# Altium PCB H.PcbDoc
Units mil, origin at the board's own origin, x right, y up, seen from the top; angles counter-clockwise.
Board outline 825 x 650 mil, 2 copper layers (Top Layer, Bottom Layer); 21 components, 0 nets, 42 pads, 7 vias.
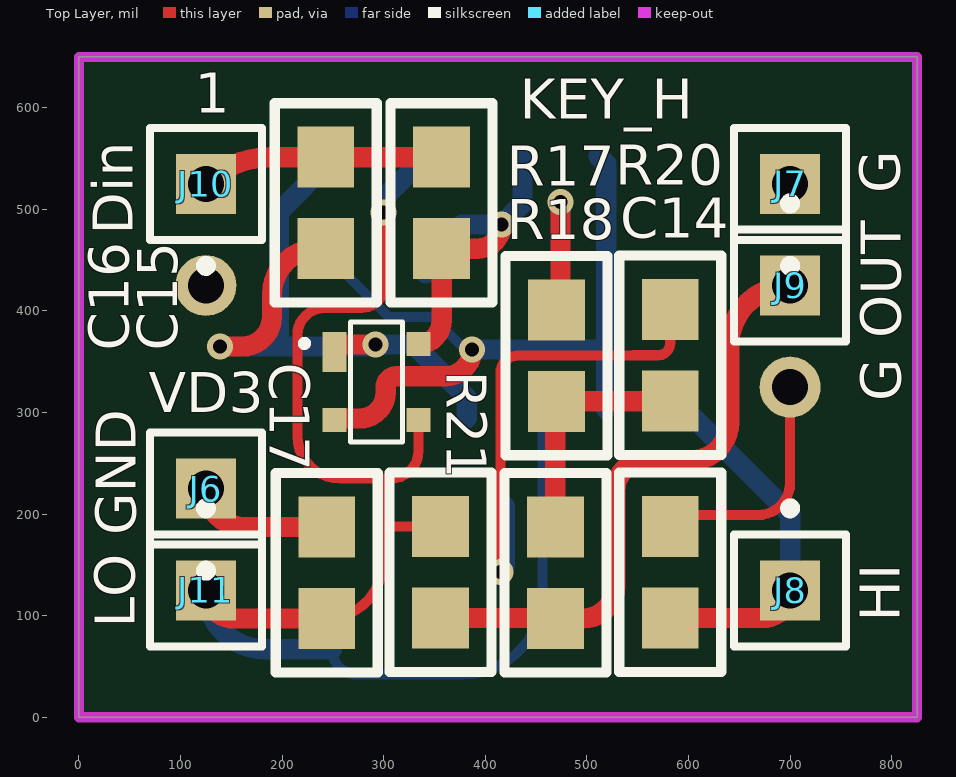
[diagram p0: Top Layer view]
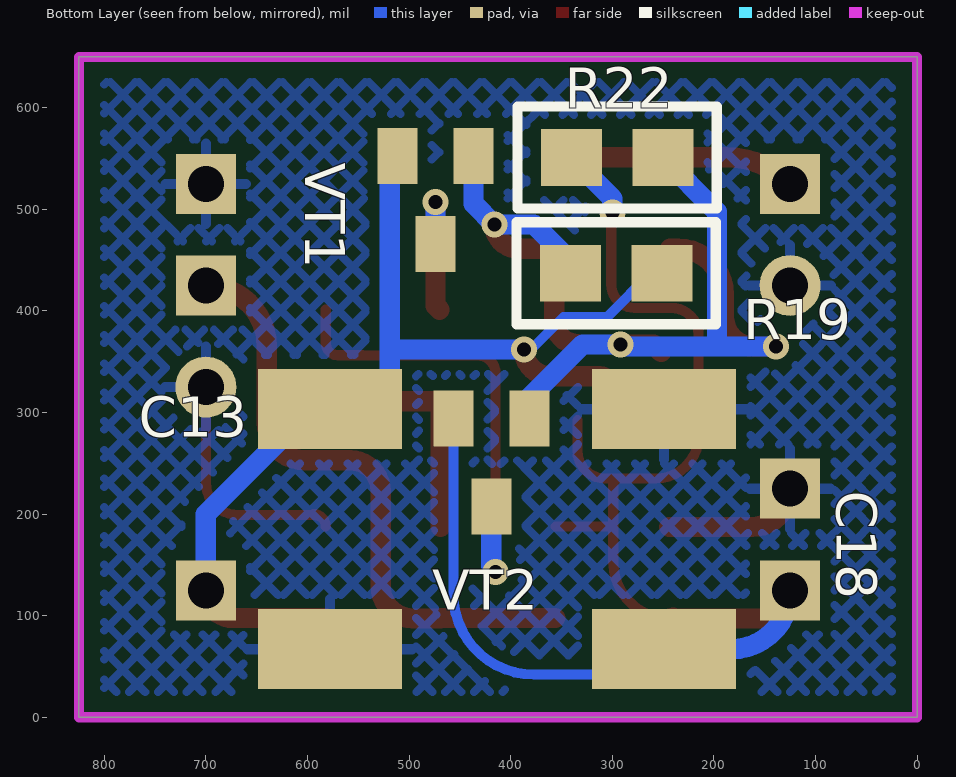
[diagram p1: Bottom Layer view, seen from below]

## Layer stack, top to bottom
Top Solder: solder mask 0.4, Solder Resist, Dk 3.5
Top Layer: signal copper 1.4
Dielectric 1: dielectric 12.6, FR-4, Dk 4.8
Bottom Layer: signal copper 1.4
Bottom Solder: solder mask 0.4, Solder Resist, Dk 3.5

## Board outline
0,0 825,0 825,650 0,650

## Design rules (kind name [scope] priority, off if disabled: settings)
Clearance [All] p1: gap=10
PolygonConnect [All] p1: connectstyle=Relief reliefconductorwidth=10 reliefentries=4 polygonreliefangle="90 Angle" airgapwidth=10
RoutingVias [All] p1: holewidth=28 width=50 viastyle="Through Hole" minholewidth=28 minwidth=50 maxholewidth=28 maxwidth=50
SolderMaskExpansion [All] p1: expansion=4
Width [All] p1: maxlimit=10 minlimit=10 preferedwidth=10
29 further rules are at their usual default settings.

## Components (designator, comment, footprint, x,y, rotation, side; value= is the part's Value field where it differs from the comment)
C13 "22,0" Cap_BIG 653,24 r180 bottom
C14 "0,1" CAP_SMALL 632,44 r90 top
C15 "100" CAP_SMALL 307,605 r270 top
C16 "100" CAP_SMALL 193,605 r270 top
C17 "0,1" CAP_SMALL 194,241 r270 top
C18 "22,0" Cap_BIG 324,24 r180 bottom
J6 "GND" PIN1 125,225 r180 top
J7 "G" PIN1 700,525 r180 top
J8 "HI" PIN1 700,125 r0 top
J9 "OUT" PIN1 700,425 r0 top
J10 "Din" PIN1 125,525 r180 top
J11 "LO" PIN1 125,125 r0 top
R17 "3" RES 519,453.71 r180 top
R18 "3" RES 518,240 r180 top
R19 "2,21" RES 394,486 r270 bottom
R20 "3" RES 631,454 r180 top
R21 "100k" RES 405,240.42 r180 top
R22 "2,21" RES 393,600 r270 bottom
VD3 "HSMS2805" SOT-143B 293,330 r270 top
VT1 "MMBT3640" SOT23-BEC_MMBT3640*(Primary) 474,509 r0 bottom
VT2 "MMBT2369" SOT23-BEC_MMBT3640*(Primary) 419,251 r0 bottom

## Footprints (in the part's own frame and the unit in brackets; to place one, negate y for a bottom-side part, rotate by r counter-clockwise, add the part's x,y. Pads: shape width x height; smd on the part's side, far side on the other; paste and mask are expansions set on the pad)
Cap_BIG [mm] "FROM_MAX"
  rect 3.6x2 smd: 1(1.905,7.092) 2(1.905,1.092)
  body extent 0,-0.01 3.81,8.19, height 2.54
CAP_SMALL [mil] "FROM_MAX"
  rect 60x55.98 smd: 1(53.71,50) 2(143.71,50)
  silkscreen extent 1,0 197,100, body extent 20,18 178,82, height 100
PIN1 [mm] "Connector; Plug"
  rect 1.5x1.5 hole 0.9: 1(0,0)
  silkscreen extent -1.4,-1.4 1.4,2.17
RES [mil] "FROM_MAX"
  rect 55.98x60 smd: 1(49,52.71) 2(49,142.71)
  silkscreen extent -1,0 99,196, body extent 17,19 81,177, height 100
SOT23-BEC_MMBT3640*(Primary) [mm]
  rect 1x1.4 smd: 1(-0.95,-1.1) 2(0.95,-1.1) 3(0,1.1)
SOT-143B [mm]
  rect 1x0.6 smd: 1(-0.75,-1.05)
  rect 0.6x0.6 smd: 2(0.95,-1.05) 3(0.95,1.05) 4(-0.95,1.05)
  silkscreen extent -1.5,-0.65 1.5,0.65

## Part data
C13 C18: library part CAP_BIG
C14 C15 C16 C17: library part CAP_SMALL
J6 J7 J8 J9 J10 J11: library part Socket, "Socket"
R17 R18 R19 R20 R21 R22: library part RES
VD3: library part HSMS-2805

## Free pads (board coordinates)
  round 60 hole 35.43: 1(125,425) 1(700,325)

## Via types
v1: diameter 25.59, hole 13.78, Top Layer to Bottom Layer, 7 vias

## Nets (pads, with @x,y where several pads share a name; then routed paths per layer and width w, separated by ;. In a path a pad name is that pad's centre, name@x,y a point inside that pad or via, vN(x,y) a via of type N, cw(c..) or ccw(c..) an arc to the next point about the centre after c; other vN are vias at no path point)
pads on no net: C13.1 C13.2 C14.1 C14.2 C15.1 C15.2 C16.1 C16.2 C17.1 C17.2 C18.1 C18.2 J6.1 J7.1 J8.1 J9.1 J10.1 J11.1 R17.1 R17.2 R18.1 R18.2 R19.1 R19.2 R20.1 R20.2 R21.1 R21.2 R22.1 R22.2 VD3.1 VD3.2 VD3.3 VD3.4 VT1.1 VT1.2 VT1.3 VT2.1 VT2.2 VT2.3
copper on no net: | length 5771.8
  Top Layer w10: 244,97.29 ccw(c244,152.29) 299,152.29 299,186 ; v1(300,497) cw(c300,496) 301,496 301,426 cw(c278,426) 278,403 242,403 ccw(c242,376) 215,376 215,277 ccw(c257,277) 257,235 299,235 ; 334.34,292.6 334.34,262.34 cw(c307,262.34) 307.53,235.01 ; 356,187.71 300.71,187.71 ccw(c300.71,186) 299,186 ; v1(415,143) 415,337 ; 415,339 cw(c432,339) 432,356 546,356 546,356.29 570,356.29 ccw(c570,368.29) 582,368.29 582,401.29 ; 594.29,200 ccw(c594.29,187.71) 582,187.71 cw(c593.29,187.71) 593.29,199 668,199 ccw(c668,231) 700,231 700,350 ; 299,186 299,235 ; 299,235 307,235 ; 307,235 ccw(c307,262.34) 307.53,235.01 ; 307,235 307.53,235
  Top Layer w20: 125,125 ccw(c152.71,125) 152.71,97.29 244,97.29 ; 125,225 ccw(c162.71,225) 162.71,187.29 244,187.29 ; 125,525 cw(c188.47,461.53) 188.47,551.29 243,551.29 357,551.29 353,555.29 ; v1(139,365) 161,365 ccw(c161,394) 190,394 190,416 cw(c235.29,416) 235.29,461.29 243,461.29 ; 240,98.29 240.58,97.71 ; 251.66,292.6 cw(c253.06,292.6) 253.06,294 276,294 ccw(c276,320) 302,320 302,325 cw(c312.59,325) 312.59,335.59 360.59,335.59 ccw(c360.59,362) v1(387,362) ; 251.66,359.53 259.13,367 v1(292,367) ; 334.34,367.4 ccw(c334.34,390.06) 357,390.06 357,461.29 392.29,461.29 ccw(c392.29,485) v1(416,485) ; 356,97.71 468.58,97.71 469,97.29 496.29,97.29 ccw(c496.29,129) 528,129 528,223 cw(c558,223) 558,253 603,253 ccw(c603,290) 640,290 640,365 cw(c700,365) 700,425 ; 469,187.29 469,310 470,311 581.71,311 ; 470,401 474,405 v1(474,507) ; 582,97.71 672.71,97.71 ccw(c672.71,125) 700,125
  Bottom Layer w5: v1@386.7,362.3 v1(387,362)
  Bottom Layer w10: 249,67 ccw(c274,67) 274,42 377.14,42 ccw(c377.14,121.26) 456.4,121.26 456.4,294.31 ; 251.29,437 262,437 304.2,394.8 304.29,394.8 305.08,394.01 347.99,394.01 v1@381,361
  Bottom Layer w20: 125,125 ccw(c183,125) 183,67 249,67 ; v1(139,365) 197,365 ; 250.29,551 197,497.71 197,365 ; v1(300,497) 300,510.71 340.29,551 ; 341.29,437 341.29,449.29 377,485 v1(416,485) 436.6,505.6 436.6,552.31 ; 381.6,294.31 381.6,314.4 329,367 v1(292,367) 290,365 197,365 ; v1(387,362) 516,362 519,365 ; v1(415,143) 419,149 419,207.69 ; 474,465.69 v1(474,507) ; 511.4,552.31 519,544.71 519,365 ; 519,303 519,365 ; 578,303.22 596.78,303.22 700,200 700,150

## Polygon pours and split planes (outlines as drawn)
no net on Bottom Layer "Top Layer-No Net" (hatched 45Degree grid 20 track 8, remove dead copper, pour order 26): 800,625 25,625 25,25 800,25

## Keep-outs
Keep-Out Layer:
  the board outline again, w10

## Silkscreen, mask and mechanical layers (free items; w line width, h text height)
Top Overlay:
  circle w10: c222,368 r1.41
  text "1" at 114,595 h39.37
  text "KEY_H" at 434,589 h39.37
  text "G" at 809,311 h39.37 r90